# Altium PCB Rail_Gun.PcbDoc
Units mm, origin at the board's own origin, x right, y up, seen from the top; angles counter-clockwise.
Board outline 255.02 x 63.37 mm, 2 copper layers (Top Layer, Bottom Layer); 88 components, 48 nets, 175 pads, 0 vias.
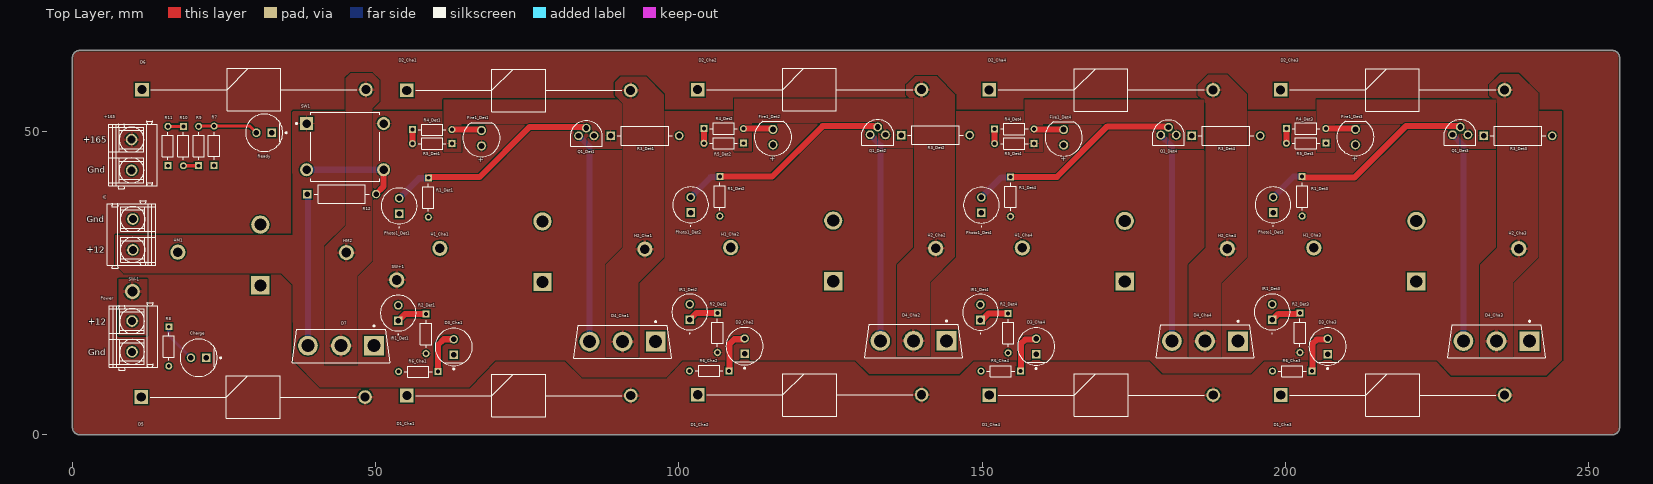
[diagram p0: Top Layer view]
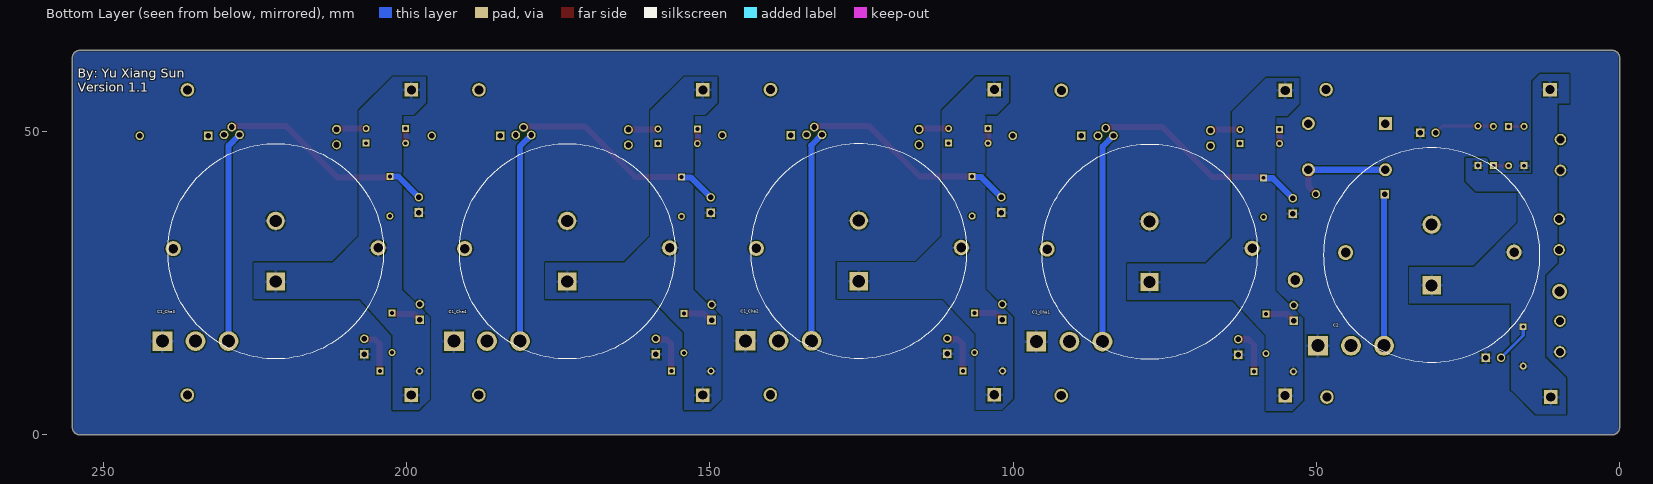
[diagram p1: Bottom Layer view, seen from below]
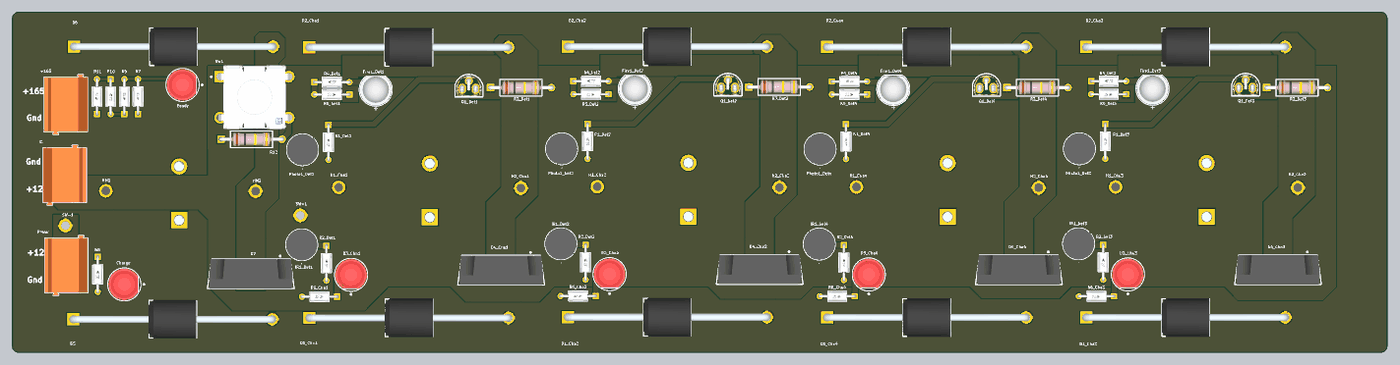
[diagram p2: 3D render of the assembled board from above, using the file's embedded part models]
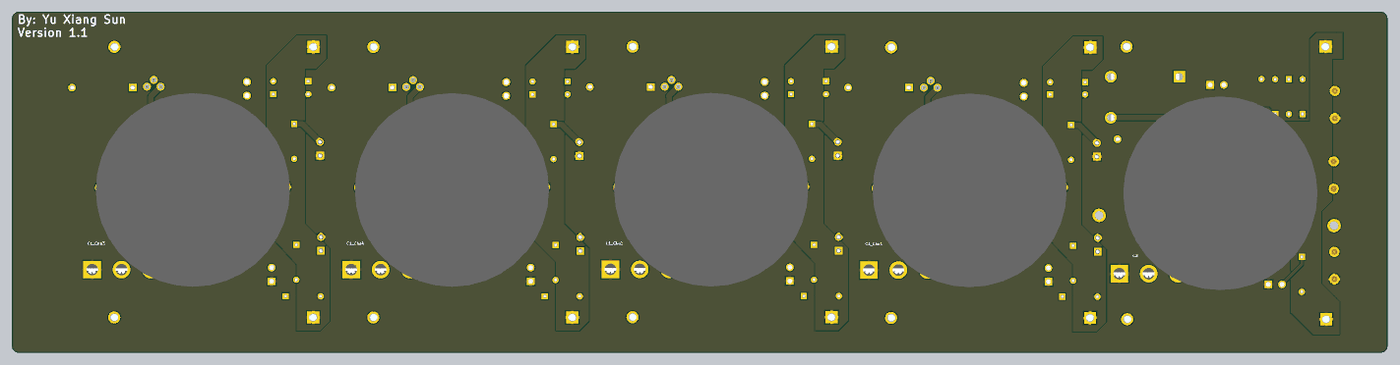
[diagram p3: 3D render of the assembled board from below, using the file's embedded part models]

## Layer stack, top to bottom
Top Solder: solder mask 0.0102, Solder Resist, Dk 3.5
Top Layer: signal copper 0.0356
Dielectric 1: dielectric 0.32, FR-4, Dk 4.8
Bottom Layer: signal copper 0.0356
Bottom Solder: solder mask 0.0102, Solder Resist, Dk 3.5

## Board outline
1.315,-0.061 cw(c1.315,1.209) 0.045,1.209 0.045,62.042 cw(c1.315,62.042) 1.315,63.312 253.791,63.312 cw(c253.791,62.042) 255.061,62.042 255.061,1.209 cw(c253.791,1.209) 253.791,-0.061

## Design rules (kind name [scope] priority, off if disabled: settings)
BoardOutlineClearance [All] p1: gap=0.2 ignorepadtopadclearanceinfootprint=FALSE
Clearance [All] p1: gap=0.203 ignorepadtopadclearanceinfootprint=FALSE except(0.25: Arc-Hole Track-Hole SMDPad-Hole THPad-Hole Via-Hole Fill-Hole Poly-Hole Region-Hole Text-Hole)
ComponentClearance [All] p1: gap=0.127 collisioncheckmode=3 verticalgap=0.127 showdistances=TRUE
DiffPairsRouting [All] p1: maxlimit=0.381 minlimit=0.203 mostfreqgap=0.203 toplayer_minwidth=0.203 toplayer_maxwidth=25.4 toplayer_prefwidth=0.203 bottomlayer_minwidth=0.203 bottomlayer_maxwidth=25.4 bottomlayer_prefwidth=0.203 maxuncoupledlength=12.7
Height [All] p1: minheight=0 maxheight=1816.048 prefheight=12.7
HoleSize [All] p1: absolutevalues=TRUE maxlimit=6.3 minlimit=0.3 maxpercent=80.000 minpercent=20.000
HoleToHoleClearance [All] p1: gap=0.25 allowstackedmicrovias=FALSE
MinimumAnnularRing [All] p1: minimumring=0.076
MinimumSolderMaskSliver [All] p1: minsoldermaskwidth=0
PlaneClearance [All] p1: clearance=0.203
PlaneConnect [All] p1: pad.planeconnectstyle=Relief pad.reliefexpansion=0.3 pad.reliefentries=4 pad.reliefconductorwidth=0.203 pad.reliefairgap=0.203 via.planeconnectstyle=Direct via.reliefexpansion=0.3 via.reliefentries=4 via.reliefconductorwidth=0.127 via.reliefairgap=0.127
PlaneConnect PlaneConnectPowerPads [InPadClass('PowerPads')] p2: planeconnectstyle=Direct reliefexpansion=0.508 reliefentries=4 reliefconductorwidth=0.254 reliefairgap=0.254
PolygonConnect Discharge [InNetClass('Discharge')] p1: thpad.connectstyle=Relief thpad.reliefconductorwidth=0.5 thpad.reliefentries=4 thpad.polygonreliefangle="90 Angle" thpad.airgapwidth=0.254 smdpad.connectstyle=Relief smdpad.reliefconductorwidth=0.5 smdpad.reliefentries=4 smdpad.polygonreliefangle="90 Angle" smdpad.airgapwidth=0.254 via.connectstyle=Relief via.reliefconductorwidth=0.254 via.reliefentries=4 via.polygonreliefangle="90 Angle" via.airgapwidth=0.254
PolygonConnect 2mmHole [HasFootprint('2mmHole')] p2: thpad.connectstyle=Relief thpad.reliefconductorwidth=0.5 thpad.reliefentries=4 thpad.polygonreliefangle="90 Angle" thpad.airgapwidth=0.254 smdpad.connectstyle=Relief smdpad.reliefconductorwidth=0.254 smdpad.reliefentries=4 smdpad.polygonreliefangle="90 Angle" smdpad.airgapwidth=0.254 via.connectstyle=Relief via.reliefconductorwidth=0.254 via.reliefentries=4 via.polygonreliefangle="90 Angle" via.airgapwidth=0.254
PolygonConnect PolygonConnectPowerPads [All vs (InPadClass('PowerPads'))] p3: connectstyle=Direct reliefconductorwidth=0.254 reliefentries=4 polygonreliefangle="90 Angle" airgapwidth=0.254
PolygonConnect [All] p4: thpad.connectstyle=Relief thpad.reliefconductorwidth=0.203 thpad.reliefentries=4 thpad.polygonreliefangle="90 Angle" thpad.airgapwidth=0.203 smdpad.connectstyle=Relief smdpad.reliefconductorwidth=0.203 smdpad.reliefentries=4 smdpad.polygonreliefangle="90 Angle" smdpad.airgapwidth=0.203 via.connectstyle=Direct via.reliefconductorwidth=0.127 via.reliefentries=4 via.polygonreliefangle="90 Angle" via.airgapwidth=0.127
RoomDefinition Cha1 [InComponentClass('Cha1')] p1: confinementstyle=ConfineIn formatcopy=TRUE lockcomponents=FALSE outline 94.615,54.229 94.742,54.356 94.742,60.96 53.721,60.96 52.832,60.071 52.832,44.45 53.594,43.688 62.992,43.688 62.992,37.973 56.134,31.115 56.134,24.13 56.642,24.13 60.452,20.32 59.563,19.431 59.563,12.7 54.229,12.7 52.705,11.176 53.467,10.414 53.467,1.524 98.298,1.524 100.711,3.937 100.711,16.891 96.139,21.463 96.139,40.894 69.342,40.894 63.373,46.863 55.753,46.863 55.753,47.27 55.118,47.905 55.118,52.451 55.753,53.086
RoomDefinition Det2 [InComponentClass('Det2')] p2: confinementstyle=ConfineIn formatcopy=TRUE lockcomponents=FALSE outline 102.436,52.569 102.182,52.315 102.182,42.155 101.42,42.155 98.118,38.853 98.118,19.041 98.372,19.041 104.849,12.564 107.643,12.564 107.643,18.279 108.278,18.914 109.167,18.025 152.474,18.025 152.474,22.724 145.235,29.963 145.235,43.679 148.537,43.679 150.061,45.203 149.299,45.965 149.299,52.823
RoomDefinition Coil_Gun_Master [InComponentClass('Coil_Gun_Master')] p3: confinementstyle=ConfineIn formatcopy=TRUE lockcomponents=FALSE outline 0.045,63.312 0.172,63.439 53.512,63.439 53.512,0.193 53.131,-0.188 0.172,-0.188 0.172,0.193 -2.622,2.987
RoomDefinition Det3 [InComponentClass('Det3')] p4: confinementstyle=ConfineIn formatcopy=TRUE lockcomponents=FALSE outline 198.419,52.569 198.165,52.315 198.165,42.155 197.403,42.155 194.101,38.853 194.101,19.041 194.355,19.041 200.832,12.564 203.626,12.564 203.626,18.279 204.261,18.914 205.15,18.025 248.457,18.025 248.457,22.724 241.218,29.963 241.218,43.679 244.52,43.679 246.044,45.203 245.282,45.965 245.282,52.823
RoomDefinition Cha3 [InComponentClass('Cha3')] p5: confinementstyle=ConfineIn formatcopy=TRUE lockcomponents=FALSE outline 197.532,61.482 245.538,61.482 246.3,60.72 246.3,53.354 200.199,53.354 198.802,51.957 198.802,43.575 211.629,43.575 216.074,48.02 230.806,48.02 241.474,37.352 241.474,27.954 238.553,27.954 236.648,26.049 236.775,25.922 236.775,19.191 241.474,19.191 245.157,15.508 245.157,0.014 198.167,0.014 197.278,0.903 197.278,12.714 202.096,12.714 204.263,14.882 204.263,27.319 197.151,34.431 197.151,41.797
RoomDefinition Cha2 [InComponentClass('Cha2')] p6: confinementstyle=ConfineIn formatcopy=FALSE lockcomponents=FALSE outline 101.443,61.534 149.449,61.534 150.211,60.772 150.211,53.406 104.11,53.406 102.713,52.009 102.713,43.627 115.54,43.627 119.985,48.072 134.717,48.072 145.385,37.404 145.385,28.006 142.464,28.006 140.559,26.101 140.686,25.974 140.686,19.243 145.385,19.243 149.068,15.56 149.068,0.066 102.078,0.066 101.189,0.955 101.189,12.766 106.006,12.766 108.174,14.933 108.174,27.371 101.062,34.483 101.062,41.849
RoomDefinition Cha4 [InComponentClass('Cha4')] p7: confinementstyle=ConfineIn formatcopy=TRUE lockcomponents=FALSE outline 149.495,61.482 197.501,61.482 198.263,60.72 198.263,53.354 152.162,53.354 150.765,51.957 150.765,43.575 163.592,43.575 168.037,48.02 182.769,48.02 193.437,37.352 193.437,27.954 190.516,27.954 188.611,26.049 188.738,25.922 188.738,19.191 193.437,19.191 197.12,15.508 197.12,0.014 150.13,0.014 149.241,0.903 149.241,12.714 154.058,12.714 156.226,14.881 156.226,27.319 149.114,34.431 149.114,41.797
RoomDefinition Det1 [InComponentClass('Det1')] p8: confinementstyle=ConfineIn formatcopy=FALSE lockcomponents=FALSE outline 54.401,52.39 54.147,52.136 54.147,41.976 53.385,41.976 50.083,38.674 50.083,18.862 50.337,18.862 56.814,12.385 59.608,12.385 59.608,18.1 60.243,18.735 61.132,17.846 104.439,17.846 104.439,22.545 97.2,29.784 97.2,43.5 100.502,43.5 102.026,45.024 101.264,45.786 101.264,52.644
RoomDefinition Det4 [InComponentClass('Det4')] p9: confinementstyle=ConfineIn formatcopy=TRUE lockcomponents=FALSE outline 150.348,52.517 150.094,52.263 150.094,42.103 149.332,42.103 146.03,38.801 146.03,18.989 146.284,18.989 152.761,12.512 155.555,12.512 155.555,18.227 156.19,18.862 157.079,17.973 200.386,17.973 200.386,22.672 193.147,29.911 193.147,43.627 196.449,43.627 197.973,45.151 197.211,45.913 197.211,52.771
RoutingVias [All] p1: holewidth=0.3 width=0.6 viastyle="Through Hole" minholewidth=0.3 minwidth=0.6 maxholewidth=0.6 maxwidth=6.6
SilkToSilkClearance [All] p1: silktosilkclearance=0
SilkToSolderMaskClearance [IsPad] p1: minsilkscreentomaskgap=0.127 clearancetoexposedcopper=TRUE
SolderMaskExpansion [All] p1: expansion=0.075 istentingtop=FALSE
SupplyNets "Schematic Supply Nets_1" [InNet('+165')] p1: voltage=0.000
SupplyNets "Schematic Supply Nets_3" [InNet('Power')] p2: voltage=0.000
SupplyNets "Schematic Supply Nets_2" [InNet('+12')] p3: voltage=0.000
SupplyNets "Schematic Supply Nets" [InNet('GND')] p4: voltage=0.000
UnpouredPolygon [InNet('GND')] p1:
Width [All] p1: maxlimit=25.4 minlimit=0.203 preferedwidth=0.203 minimp=50.000000 maximp=50.000000 favimp=50.000000
19 further rules are at their usual default settings.

## Classes and differential pairs
net class Discharge: +165 GND NetC1_Cha1_1 NetC1_Cha2_1 NetC1_Cha3_1 NetC1_Cha4_1 NetC2_1 NetD2_Cha1_2 NetD2_Cha2_2 NetD2_Cha3_2 NetD2_Cha4_2 NetD6_2
component class Det4: Fire1_Det4 IR1_Det4 Photo1_Det4 Q1_Det4 R1_Det4 R2_Det4 R3_Det4 R4_Det4 R5_Det4
component class Det3: Fire1_Det3 IR1_Det3 Photo1_Det3 Q1_Det3 R1_Det3 R2_Det3 R3_Det3 R4_Det3 R5_Det3
component class Cha4: C1_Cha4 D1_Cha4 D2_Cha4 D3_Cha4 D4_Cha4 H1_Cha4 H2_Cha4 R6_Cha4
component class Cha3: C1_Cha3 D1_Cha3 D2_Cha3 D3_Cha3 D4_Cha3 H1_Cha3 H2_Cha3 R6_Cha3
component class Det2: Fire1_Det2 IR1_Det2 Photo1_Det2 Q1_Det2 R1_Det2 R2_Det2 R3_Det2 R4_Det2 R5_Det2
component class Cha2: C1_Cha2 D1_Cha2 D2_Cha2 D3_Cha2 D4_Cha2 H1_Cha2 H2_Cha2 R6_Cha2
channel class Detection_Circuit: Det1 Det2 Det3 Det4
channel class Charge_Discharge: Cha1 Cha2 Cha3 Cha4
component class Det1: Fire1_Det1 IR1_Det1 Photo1_Det1 Q1_Det1 R1_Det1 R2_Det1 R3_Det1 R4_Det1 R5_Det1
component class Cha1: C1_Cha1 D1_Cha1 D2_Cha1 D3_Cha1 D4_Cha1 H1_Cha1 H2_Cha1 L1 R6_Cha1
component class Coil_Gun_Master: +165 C2 Charge D5 D6 D7 HM1 HM2 IC Power R7 R8 R9 R10 R11 R12 Ready SW1 SW+1 SW-1

## Components (designator, comment, footprint, x,y, rotation, side; value= is the part's Value field where it differs from the comment)
+165 "Power" PM_5_08_90_02 10.016,46.066 r270 top
C1_Cha1 "1000uF 450V" CAPPRD1000W180D3550H6250 77.515,25.118 r90 bottom (schematic designator C1)
C1_Cha2 "1000uF 450V" CAPPRD1000W180D3550H6250 125.446,25.245 r90 bottom (schematic designator C1)
C1_Cha3 "1000uF 450V" CAPPRD1000W180D3550H6250 221.535,25.193 r90 bottom (schematic designator C1)
C1_Cha4 "1000uF 450V" CAPPRD1000W180D3550H6250 173.498,25.193 r90 bottom (schematic designator C1)
C2 "1000uF 450V" CAPPRD1000W180D3550H6250 31.033,24.577 r90 bottom
Charge "Blue LED" FP-XLUR12D-MFG 20.873,12.639 r180 top (schematic designator Charge1)
D1_Cha1 "6A10GHR0" DIOAD3685W130L885D700 55.186,6.416 r0 top (schematic designator D1)
D1_Cha2 "6A10GHR0" DIOAD3685W130L885D700 103.117,6.543 r0 top (schematic designator D1)
D1_Cha3 "6A10GHR0" DIOAD3685W130L885D700 199.206,6.491 r0 top (schematic designator D1)
D1_Cha4 "6A10GHR0" DIOAD3685W130L885D700 151.169,6.491 r0 top (schematic designator D1)
D2_Cha1 "FR-605" DIOAD3685W130L885D700 55.163,56.708 r0 top (schematic designator D2)
D2_Cha2 "FR-605" DIOAD3685W130L885D700 103.094,56.835 r0 top (schematic designator D2)
D2_Cha3 "FR-605" DIOAD3685W130L885D700 199.183,56.783 r0 top (schematic designator D2)
D2_Cha4 "FR-605" DIOAD3685W130L885D700 151.146,56.783 r0 top (schematic designator D2)
D3_Cha1 "Blue LED" FP-XLUR12D-MFG 62.91,14.417 r90 top (schematic designator D3)
D3_Cha2 "Blue LED" FP-XLUR12D-MFG 110.841,14.544 r90 top (schematic designator D3)
D3_Cha3 "Blue LED" FP-XLUR12D-MFG 206.93,14.492 r90 top (schematic designator D3)
D3_Cha4 "Blue LED" FP-XLUR12D-MFG 158.893,14.492 r90 top (schematic designator D3)
D4_Cha1 "Thrysistor" FP-VS-70TPS12PBF-0 90.734,15.281 r270 top (schematic designator D4)
D4_Cha2 "Thrysistor" FP-VS-70TPS12PBF-0 138.665,15.408 r270 top (schematic designator D4)
D4_Cha3 "Thrysistor" FP-VS-70TPS12PBF-0 234.754,15.356 r270 top (schematic designator D4)
D4_Cha4 "Thrysistor" FP-VS-70TPS12PBF-0 186.717,15.356 r270 top (schematic designator D4)
D5 "6A10GHR0" DIOAD3685W130L885D700 11.405,6.162 r0 top
D6 "FR605G" DIOAD3685W130L885D700 11.532,56.835 r0 top
D7 "Thrysistor" FP-VS-70TPS12PBF-0 44.326,14.603 r270 top
Fire1_Det1 "Red LED" WL-TMRC_D5.9H8.7 67.482,48.834 r90 top (schematic designator Fire1)
Fire1_Det2 "Red LED" WL-TMRC_D5.9H8.7 115.517,49.013 r90 top (schematic designator Fire1)
Fire1_Det3 "Red LED" WL-TMRC_D5.9H8.7 211.5,49.013 r90 top (schematic designator Fire1)
Fire1_Det4 "Red LED" WL-TMRC_D5.9H8.7 163.429,48.961 r90 top (schematic designator Fire1)
H1_Cha1 "2mm Hole" 2mmHole 60.624,30.8 r90 top (schematic designator H1)
H1_Cha2 "2mm Hole" 2mmHole 108.555,30.927 r90 top (schematic designator H1)
H1_Cha3 "2mm Hole" 2mmHole 204.644,30.875 r90 top (schematic designator H1)
H1_Cha4 "2mm Hole" 2mmHole 156.607,30.875 r90 top (schematic designator H1)
H2_Cha1 "2mm Hole" 2mmHole 94.406,30.673 r90 top (schematic designator H2)
H2_Cha2 "2mm Hole" 2mmHole 142.337,30.8 r90 top (schematic designator H2)
H2_Cha3 "2mm Hole" 2mmHole 238.426,30.748 r90 top (schematic designator H2)
H2_Cha4 "2mm Hole" 2mmHole 190.389,30.748 r90 top (schematic designator H2)
HM1 "2mm Hole" 2mmHole 17.571,30.038 r0 top
HM2 "2mm Hole" 2mmHole 45.339,29.972 r0 top
IC "IC Power" PM_5_08_90_02 9.824,32.959 r90 top
IR1_Det1 "IR333_H0-A" IR333H0A 53.766,18.735 r90 top (schematic designator IR1)
IR1_Det2 "IR333_H0-A" IR333H0A 101.801,18.914 r90 top (schematic designator IR1)
IR1_Det3 "IR333_H0-A" IR333H0A 197.784,18.914 r90 top (schematic designator IR1)
IR1_Det4 "IR333_H0-A" IR333H0A 149.713,18.862 r90 top (schematic designator IR1)
Photo1_Det1 "PT334-6C" PT3346C 53.915,36.395 r90 top (schematic designator Photo1)
Photo1_Det2 "PT334-6C" PT3346C 101.95,36.574 r90 top (schematic designator Photo1)
Photo1_Det3 "PT334-6C" PT3346C 197.933,36.574 r90 top (schematic designator Photo1)
Photo1_Det4 "PT334-6C" PT3346C 149.862,36.522 r90 top (schematic designator Photo1)
Power "IC Power" PM_5_08_90_02 10.098,16.152 r270 top
Q1_Det1 "SS8050DBU" FP-135AN-MFG 84.754,49.595 r270 top (schematic designator Q1)
Q1_Det2 "SS8050DBU" FP-135AN-MFG 132.789,49.774 r270 top (schematic designator Q1)
Q1_Det3 "SS8050DBU" FP-135AN-MFG 228.772,49.774 r270 top (schematic designator Q1)
Q1_Det4 "SS8050DBU" FP-135AN-MFG 180.701,49.722 r270 top (schematic designator Q1)
R1_Det1 "10k" FP-CFR16-MFG 58.719,39.055 r270 top (schematic designator R1)
R1_Det2 "10k" FP-CFR16-MFG 106.754,39.234 r270 top (schematic designator R1)
R1_Det3 "10k" FP-CFR16-MFG 202.737,39.234 r270 top (schematic designator R1)
R1_Det4 "10k" FP-CFR16-MFG 154.666,39.182 r270 top (schematic designator R1)
R2_Det1 "2.2k" FP-CFR16-MFG 58.338,16.576 r270 top (schematic designator R2)
R2_Det2 "2.2k" FP-CFR16-MFG 106.373,16.755 r270 top (schematic designator R2)
R2_Det3 "2.2k" FP-CFR16-MFG 202.356,16.755 r270 top (schematic designator R2)
R2_Det4 "2.2k" FP-CFR16-MFG 154.285,16.703 r270 top (schematic designator R2)
R3_Det1 "47 1W" FP-RR01-MFG 94.406,49.215 r0 top (schematic designator R3)
R3_Det2 "47 1W" FP-RR01-MFG 142.285,49.342 r0 top (schematic designator R3)
R3_Det3 "47 1W" FP-RR01-MFG 238.297,49.215 r0 top (schematic designator R3)
R3_Det4 "47 1W" FP-RR01-MFG 190.164,49.215 r0 top (schematic designator R3)
R4_Det1 "68" FP-CFR16-MFG 59.354,50.231 r0 top (schematic designator R4)
R4_Det2 "68" FP-CFR16-MFG 107.389,50.41 r0 top (schematic designator R4)
R4_Det3 "68" FP-CFR16-MFG 203.372,50.41 r0 top (schematic designator R4)
R4_Det4 "68" FP-CFR16-MFG 155.301,50.358 r0 top (schematic designator R4)
R5_Det1 "20" FP-CFR16-MFG 59.354,47.945 r180 top (schematic designator R5)
R5_Det2 "20" FP-CFR16-MFG 107.389,47.997 r180 top (schematic designator R5)
R5_Det3 "20" FP-CFR16-MFG 203.372,47.997 r180 top (schematic designator R5)
R5_Det4 "20" FP-CFR16-MFG 155.301,47.945 r180 top (schematic designator R5)
R6_Cha1 "1M" FP-CFR16-MFG 57.068,10.353 r180 top (schematic designator R6)
R6_Cha2 "1M" FP-CFR16-MFG 104.999,10.48 r180 top (schematic designator R6)
R6_Cha3 "1M" FP-CFR16-MFG 201.088,10.428 r180 top (schematic designator R6)
R6_Cha4 "1M" FP-CFR16-MFG 153.051,10.428 r180 top (schematic designator R6)
R7 "1M" FP-CFR16-MFG 23.413,47.564 r90 top
R8 "1M" FP-CFR16-MFG 15.943,14.502 r270 top
R9 "10k" FP-CFR16-MFG 20.878,47.537 r90 top
R10 "10k" FP-CFR16-MFG 18.338,47.537 r270 top
R11 "2.2k" FP-CFR16-MFG 15.798,47.537 r90 top
R12 "400 1W" FP-RR01-MFG 44.45,39.624 r0 top
Ready "White" FP-XLUR12D-MFG 31.668,49.723 r180 top (schematic designator Ready1)
SW1 "Initial Switch" FP-1241_1625_8-MFG 45.003,47.437 r0 top
SW+1 "2mm Hole" 2mmHole 53.639,25.466 r0 top
SW-1 "2mm Hole" 2mmHole 10.078,23.561 r0 top

## Footprints (in the part's own frame and the unit in brackets; to place one, negate y for a bottom-side part, rotate by r counter-clockwise, add the part's x,y. Pads: shape width x height; smd on the part's side, far side on the other; paste and mask are expansions set on the pad)
2mmHole [mm]
  round 2.5 / inner round 1.524 / far side round 2.5 hole 1.6 paste-2539.97: 1(-0.127,0)
CAPPRD1000W180D3550H6250 [mm]
  rect 3x3 hole 2: 1(0,0)
  round 3 hole 2: 2(10,0)
  silkscreen extent -12.75,-17.75 22.75,17.75, body extent -13,-17.97 23,17.97, height 62.5
DIOAD3685W130L885D700 [mm]
  rect 2.25x2.25 hole 1.5: 1(0,0)
  round 2.25 hole 1.5: 2(36.9,0)
  silkscreen extent 1.48,-3.5 35.42,3.5, body extent -0.65,-3.59 37.5,3.59, height 7.2
FP-135AN-MFG [mm]
  round 1.45 hole 0.95 paste-2539.97 mask+0: 1(0.38,-1.27) 2(-0.89,0) 3(0.38,1.27)
  silkscreen extent -2.1,-2.6 2.09,2.6, body extent -2.19,-2.7 2.19,2.7, height 0.25
FP-1241_1625_8-MFG [mm]
  rect 2.15x2.15 hole 1.4 paste-2539.97 mask+0: 1(-6.35,3.81)
  round 2.15 hole 1.4 paste-2539.97 mask+0: 2(6.35,3.81) 3(-6.35,-3.81) 4(6.35,-3.81)
  silkscreen extent -8.12,-5.7 5.7,5.7, body extent -7.52,-5.8 7.52,5.8, height 0.25
FP-CFR16-MFG [mm]
  rect 1.15x1.15 hole 0.65 paste-2539.97 mask+0: 1(-3.25,0)
  round 1.15 hole 0.65 paste-2539.97 mask+0: 2(3.25,0)
  silkscreen extent -2.27,-0.92 2.27,0.92, body extent -3.93,-1.02 3.93,1.02, height 0.25
FP-RR01-MFG [mm]
  rect 1.4x1.4 hole 0.9 paste-2539.97 mask+0: 1(-5.65,0)
  round 1.4 hole 0.9 paste-2539.97 mask+0: 2(5.65,0)
  silkscreen extent -4.55,-1.55 4.55,1.55, body extent -6.45,-1.65 6.45,1.65, height 0.25
FP-VS-70TPS12PBF-0 [mm]
  rect 3.25x3.25 hole 2.15 paste-2539.97 mask+0: 1(-0.025,5.45)
  round 3.25 hole 2.15 paste-2539.97 mask+0: 2(-0.025,0) 3(-0.025,-5.45)
  silkscreen extent -3.42,-8.05 2.75,8.05, body extent -2.85,-8.15 2.85,8.15, height 0.25
FP-XLUR12D-MFG [mm]
  rect 1.4x1.4 hole 0.9 paste-2539.97 mask+0: 1(-1.27,0)
  round 1.4 hole 0.9 paste-2539.97 mask+0: 2(1.27,0)
  silkscreen extent -3.75,-3.08 3.08,3.08, body extent -3.17,-3.17 3.17,3.17, height 0.25
IR333H0A [mm]
  rect 1.416x1.416 hole 0.91: 1(0,0)
  round 1.416 hole 0.91: 2(2.54,0)
  silkscreen extent -2.3,-2.95 4.22,2.95, body extent -1.68,-2.95 4.22,2.95, height 10.5
PM_5_08_90_02 [mm] "PM 5.08/02/90 3.5"
  round 1.9 hole 1.3: A1(-2.54,-0.2) A2(2.54,-0.2)
  silkscreen extent -5.58,-4 5.58,4, body extent -5.58,-4 5.58,4, height 10.01
PT3346C [mm]
  rect 1.416x1.416 hole 0.91: 1(0,0)
  round 1.416 hole 0.91: 2(2.54,0)
  silkscreen extent -2.3,-2.95 4.22,2.95, body extent -1.68,-2.95 4.22,2.95, height 10.5
WL-TMRC_D5.9H8.7 [mm] "THT Mono-color Round Color LED, 2-leads"
  round 1.5 hole 1: 1(-1.27,0) 2(1.27,0)
  silkscreen extent -3.07,-3.07 2.58,3.08, body extent -2.95,-2.95 2.45,2.95, height 9.2

## Part data
+165 IC Power: library part CMP-1559-01627-1, "OMNIMATE Signal - series PM", Colour=Orange, Manufacturer=Weidmueller, PartNumber=1760490000, Rated_current_use_group_B_UL_1059="15 A", Rated_voltage_for_surge_voltage_class_pollution_degree_II_2="600 V", Rated_voltage_use_group_B_UL_1059="300 V", UL_94_flammability_rating=V-0, ComponentLink1Description="Manufacturer URL", ComponentLink1URL=http://www.weidmueller.com/, ComponentLink2Description="URL Link1", ComponentLink2URL=http://catalog.weidmueller.com/catalog/Start.do?localeId=en&ObjectID=1760490000, Contact_material=Cu-Leg, Contact_surface=tinned, Insulating_material="Wemid (PA)", Mounting_onto_the_PCB="Solder connection", No_of_poles=2, PackageReference=PM_5_08_90_02, Packaging=Box, Pitch_inch="0,2 inch", Pitch_mm="5,08 mm", Qty="500 PCS", Revision=V1, Short_text_for_material="PM 5.08/02/90 3.5SN OR BX", Side_termination_characteristic="closed side", Solder_pin_length_mm="3,5 mm", Solid_max_H05_07_V_U="2,5 mm²", Solid_min_H05_07_V_U="0,13 mm²", Wire_cross_section_AWG_max_UL_1059="AWG 14", Wire_cross_section_AWG_min_UL_1059="AWG 26"
C1_Cha1 C1_Cha2 C1_Cha3 C1_Cha4 C2: library part EKHS451VSN102MA60S, "Capacitor Polarised", Manufacturer_Name=Chemi-Con, Datasheet Link=https://www.mouser.cn/datasheet/2/420/United-Chemi-Con-1708643.pdf, Height=62.5mm, Manufacturer_Part_Number=EKHS451VSN102MA60S
Charge D3_Cha1 D3_Cha2 D3_Cha3 D3_Cha4 Ready: library part CMP-02085-08376351-1, "627nm Red LED; 5x8.6mm, Through-Hole Mount with Red Diffused Round Lamp", Case/Package=Radial, Color=Red, Forward Voltage=1.9V, Test Current=10mA, Dominant Wavelength=617nm, Height=8.6mm, Lens Color=Red, Lens Transparency=Diffused, Lifecycle Status=Production, Luminous Intensity=39mcd, Mount="Through Hole", RoHS=Compliant, Viewing Angle=30°, Wavelength=627nm
D1_Cha1 D1_Cha2 D1_Cha3 D1_Cha4 D5: "Diode", Manufacturer_Name="Taiwan Semiconductor", Mouser Part Number=821-6A10GHR0, Datasheet Link=https://www.mouser.ca/ProductDetail/Taiwan-Semiconductor/6A10GHR0/?qs=iDAqbRYIEyDCJDGbzj9j3Q%3D%3D, Manufacturer_Part_Number=6A10GHR0, Mouser Price/Stock=https://www.mouser.co.uk/ProductDetail/Taiwan-Semiconductor/6A10GHR0/?qs=iDAqbRYIEyDCJDGbzj9j3Q%3D%3D
D2_Cha1 D2_Cha2 D2_Cha3 D2_Cha4 D6: library part 6A10GHR0, "Diode", Manufacturer_Name="Taiwan Semiconductor", Mouser Part Number=821-6A10GHR0, Datasheet Link=https://www.mouser.ca/ProductDetail/Taiwan-Semiconductor/6A10GHR0/?qs=iDAqbRYIEyDCJDGbzj9j3Q%3D%3D, Manufacturer_Part_Number=6A10GHR0, Mouser Price/Stock=https://www.mouser.co.uk/ProductDetail/Taiwan-Semiconductor/6A10GHR0/?qs=iDAqbRYIEyDCJDGbzj9j3Q%3D%3D
D4_Cha1 D4_Cha2 D4_Cha3 D4_Cha4 D7: library part CMP-02544-000003-1, "SCR 1.2KV 75A SUPER-247", Case/Package=TO-247, Current Rating=70A, Forward Voltage=1.4V, Hold Current=200mA, Max Operating Temperature=125°C, Max Repetitive Reverse Voltage (Vrrm)=1.2kV, Min Operating Temperature=-40°C, Package Quantity=500, RMS Current (Irms)=75A, Contact Plating=Tin, Height=20.8mm, Length=16.1mm, Mount="Through Hole", Number of Pins=247, Packaging=Bulk, Radiation Hardening=No, RoHS Compliant=Yes, Series=-, Weight=0.211644oz, Width=5.5mm
Fire1_Det1 Fire1_Det2 Fire1_Det3 Fire1_Det4: library part CMP-1488-00008-3, "WL-TMRC Red Color Diffused 5 mm Round Through Hole LED", Case/Package=Radial, Color=Red, Forward Current=100mA, Forward Voltage=2.1V, Manufacturer Lifecycle Status=ACTIVE, Max Operating Temperature=85°C, Max Reverse Voltage (DC)=5V, Min Operating Temperature=-40°C, Test Current=20mA, Dominant Wavelength=645nm, Height=8.6mm, Length=5mm, Lens Size=5mm, Lens Style="Circular, Diffused, Round", Lifecycle Status=Production, Luminous Intensity=30mcd, Mount="Through Hole", Packaging=Bulk, Peak Wavelength=650nm, REACH SVHC=Unknown, RoHS=Compliant, Viewing Angle=60°, Wavelength=630nm, Width=5mm, YEOL="1 = Estimated lifetime > 10 years"
H1_Cha1 H1_Cha2 H1_Cha3 H1_Cha4 H2_Cha1 H2_Cha2 H2_Cha3 H2_Cha4 HM1 HM2 SW+1 SW-1: library part Hole2
IR1_Det1 IR1_Det2 IR1_Det3 IR1_Det4: "LED", Manufacturer_Name=Everlight, Manufacturer_Part_Number=IR333/H0-A, Mouser Part Number=638-IR333/H0-A, Datasheet Link=https://datasheet.lcsc.com/lcsc/1808280419_Everlight-Elec-IR333-H0-A_C264292.pdf, Height=10.4mm, Mouser Price/Stock=https://www.mouser.co.uk/ProductDetail/Everlight/IR333-H0-A?qs=By6Nw2ByBD39%252BlkBkN%2FobQ%3D%3D
Photo1_Det1 Photo1_Det2 Photo1_Det3 Photo1_Det4: "Phototransistor", Manufacturer_Name=Everlight, Mouser Part Number=638-PT334-6C, Arrow Part Number=PT334-6C, Arrow Price/Stock=https://www.arrow.com/en/products/pt334-6c/everlight-electronics?utm_currency=USD&region=nac, Datasheet Link=https://ar.mouser.com/datasheet/2/143/EVER_S_A0003541250_1-2548712.pdf, Height=10.4mm, Manufacturer_Part_Number=PT334-6C, Mouser Price/Stock=https://www.mouser.co.uk/ProductDetail/Everlight/PT334-6C?qs=1zthkiRbLn0w%252B4NEo66uDw%3D%3D
Q1_Det1 Q1_Det2 Q1_Det3 Q1_Det4: library part CMP-00278-84331634-1, "SS8050DBU Bipolar (BJT) Single Transistor, NPN, 25 V, 100 MHz, 1 W, 1.5 A, 160", Case/Package=TO-92, Collector Base Voltage (VCBO)=40V, Collector Emitter Breakdown Voltage=25V, Collector Emitter Saturation Voltage=500mV, Current Rating=1.5A, Emitter Base Voltage (VEBO)=6V, Frequency=100MHz, Manufacturer Lifecycle Status=ACTIVE, Max Junction Temperature (Tj)=150°C, Max Power Dissipation=1W, Min Operating Temperature=-65°C, Output Power=2W, Collector Emitter Voltage (VCEO)=25V, Element Configuration=Single, Gain Bandwidth Product=100MHz, Height=4.58mm, hFE Min=85, Lead Free="Lead Free", Length=4.58mm, Lifecycle Status=Production, Max Collector Current=1.5A, Max Frequency=100MHz, Max Operating Temperature=150°C, Mount="Through Hole", NexarPartId=84331634, Number of Elements=1, Number of Pins=3, Packaging=Bulk, Polarity=NPN, Power Dissipation=1W, Radiation Hardening=No, REACH SVHC="No SVHC", RoHS=Compliant, Schedule B="8541290080, 8541290080", Transition Frequency=100MHz, Voltage Rating (DC)=25V, Weight=179mg, Width=3.86mm
R1_Det1 R1_Det2 R1_Det3 R1_Det4 R2_Det1 R2_Det2 R2_Det3 R2_Det4 R4_Det1 R4_Det2 R4_Det3 R4_Det4 R5_Det1 R5_Det2 R5_Det3 R5_Det4 R6_Cha1 R6_Cha2 R6_Cha3 R6_Cha4 R7 R8 R9 R10 R11: library part CMP-03212-000007-1, "RES 120 OHM 1/4W 5% AXIAL", Case/Package=Axial, Max Operating Temperature=155°C, Max Power Dissipation=250mW, Min Operating Temperature=-55°C, Number of Resistors=1, Package Quantity=5000, Resistance=120R, Resistance Tolerance=5%, Resistor Type="Thin Film", Temperature Coefficient=0ppm/°C, Voltage Rating=200V, Diameter=1.85mm, ELV=Compliant, Length=3.5mm, Mount=Axial, Number of Terminations=2, Packaging="Cut Tape", Power Rating=250mW, REACH SVHC="No SVHC", RoHS Compliant=Yes, Series="CFR16, Neohm", Technology="CARBON FILM", Termination=Axial, Tolerance=5%, Voltage Rating (DC)=200V
R3_Det1 R3_Det2 R3_Det3 R3_Det4 R12: library part CMP-03212-000006-1, "RES 100 OHM 5% 1W AXIAL", Case/Package=Axial, Number of Resistors=1, Power Rating=1W, Resistance=100R, Resistor Type="Power resistor", Temperature Coefficient=300ppm/°C, Tolerance=5%, Voltage Rating=350V, ELV=Compliant, Mount=Axial, Number of Terminations=2, Packaging="Ammo Pack", RoHS Compliant=Yes
SW1: library part CMP-26316-000004-1, "SWITCH TACTILE SPST-NO 0.05A 42V", Current Rating=50mA, Max Operating Temperature=85°C, Max Voltage Rating (AC)=30V, Max Voltage Rating (DC)=42V, Min Operating Temperature=-40°C, Operating Force=220gf, Package Quantity=100, Ratings=IP67, Actuator Material=Polyphenylene, Actuator Type=Standard, Illumination Type=Non-Illuminated, Max Current Rating=50mA, Mechanical Life=1000000Cycles, Mount="Through Hole", Packaging=Bulk, Radiation Hardening=No, RoHS Compliant=Yes, Series=PMS, Switch Function=Off-Mom, Switch Travel=0.35mm, Termination="PC Pin", Throw Configuration=SPST, Voltage Rating (AC)=30V, Voltage Rating (DC)=42V, Weight=0.003527oz

## Nets (pads, with @x,y where several pads share a name; then routed paths per layer and width w, separated by ;. In a path a pad name is that pad's centre, name@x,y a point inside that pad or via, vN(x,y) a via of type N, cw(c..) or ccw(c..) an arc to the next point about the centre after c; other vN are vias at no path point)
+12: Fire1_Det1.1 Fire1_Det2.1 Fire1_Det3.1 Fire1_Det4.1 IC.A1 R1_Det1.2 R1_Det2.2 R1_Det3.2 R1_Det4.2 R2_Det1.2 R2_Det2.2 R2_Det3.2 R2_Det4.2 R3_Det1.2 R3_Det2.2 R3_Det3.2 R3_Det4.2 SW1.1 SW1.2 SW+1.1
+165: +165.A1 D1_Cha1.2 D1_Cha2.2 D1_Cha3.2 D1_Cha4.2 D5.2
GND: +165.A2 C1_Cha1.2 C1_Cha2.2 C1_Cha3.2 C1_Cha4.2 C2.2 Charge.1 D3_Cha1.1 D3_Cha2.1 D3_Cha3.1 D3_Cha4.1 D4_Cha1.1 D4_Cha2.1 D4_Cha3.1 D4_Cha4.1 D7.1 IC.A2 IR1_Det1.2 IR1_Det2.2 IR1_Det3.2 IR1_Det4.2 Photo1_Det1.1 Photo1_Det2.1 Photo1_Det3.1 Photo1_Det4.1 Power.A2 R11.1 Ready.1
NetC1_Cha1_1: C1_Cha1.1 D1_Cha1.1 D2_Cha1.1 H1_Cha1.1 R6_Cha1.2
NetC1_Cha2_1: C1_Cha2.1 D1_Cha2.1 D2_Cha2.1 H1_Cha2.1 R6_Cha2.2
NetC1_Cha3_1: C1_Cha3.1 D1_Cha3.1 D2_Cha3.1 H1_Cha3.1 R6_Cha3.2
NetC1_Cha4_1: C1_Cha4.1 D1_Cha4.1 D2_Cha4.1 H1_Cha4.1 R6_Cha4.2
NetC2_1: C2.1 D5.1 D6.1 HM1.1 R7.1 R8.2
NetCharge_2: Charge.2 R8.1 | length 6.6
  Bottom Layer w0.5: R8.1 15.943,16.299 Charge.2
NetD2_Cha1_2: D2_Cha1.2 D4_Cha1.2 H2_Cha1.1
NetD2_Cha2_2: D2_Cha2.2 D4_Cha2.2 H2_Cha2.1
NetD2_Cha3_2: D2_Cha3.2 D4_Cha3.2 H2_Cha3.1
NetD2_Cha4_2: D2_Cha4.2 D4_Cha4.2 H2_Cha4.1
NetD3_Cha1_2: D3_Cha1.2 R6_Cha1.1 | length 7.4
  Top Layer w1: R6_Cha1.1 60.318,14.746 61.259,15.687 D3_Cha1.2
NetD3_Cha2_2: D3_Cha2.2 R6_Cha2.1 | length 7.1
  Top Layer w1: R6_Cha2.1@108.324,10.48 108.324,10.998 108.324,14.873 109.138,15.687 110.605,15.687 110.656,15.738 D3_Cha2.2@110.684,15.709
NetD3_Cha3_2: D3_Cha3.2 R6_Cha3.1 | length 7.2
  Top Layer w1: R6_Cha3.1@204.413,10.428 204.413,10.946 204.413,14.948 205.1,15.635 206.695,15.635 206.745,15.686 D3_Cha3.2@206.774,15.658
NetD3_Cha4_2: D3_Cha4.2 R6_Cha4.1 | length 7.2
  Top Layer w1: R6_Cha4.1@156.376,10.428 156.376,10.946 156.376,14.948 157.063,15.635 158.657,15.635 158.708,15.686 D3_Cha4.2@158.736,15.657
NetD4_Cha1_3: D4_Cha1.3 Q1_Det1.1 | length 34.5
  Bottom Layer w1: Q1_Det1.1 85.284,47.415 D4_Cha1.3@85.284,15.433
NetD4_Cha2_3: D4_Cha2.3 Q1_Det2.1 | length 34.5
  Bottom Layer w1: Q1_Det2.1 133.319,47.594 ; D4_Cha2.3@133.215,15.56 133.215,47.542
NetD4_Cha3_3: D4_Cha3.3 Q1_Det3.1 | length 34.5
  Bottom Layer w1: Q1_Det3.1 229.302,47.594 ; D4_Cha3.3@229.304,15.508 229.304,47.49
NetD4_Cha4_3: D4_Cha4.3 Q1_Det4.1 | length 34.5
  Bottom Layer w1: Q1_Det4.1 181.231,47.542 ; D4_Cha4.3@181.267,15.508 181.267,47.49
NetD6_2: D6.2 D7.2 HM2.1
NetD7_3: D7.3 R12.1 | length 25.2
  Top Layer w2: D7.3@38.653,14.851 D7.3
  Bottom Layer w1: D7.3 R12.1@38.876,39.548
NetFire1_Det1_2: Fire1_Det1.2 R4_Det1.2 | length 4.9
  Top Layer w1: R4_Det1.2 67.219,50.231 67.346,50.104 Fire1_Det1.2
NetFire1_Det2_2: Fire1_Det2.2 R4_Det2.2 | length 4.9
  Top Layer w1: R4_Det2.2 115.254,50.41 115.381,50.283 Fire1_Det2.2
NetFire1_Det3_2: Fire1_Det3.2 R4_Det3.2 | length 4.9
  Top Layer w1: R4_Det3.2 211.019,50.41 211.05,50.379 211.404,50.379 Fire1_Det3.2
NetFire1_Det4_2: Fire1_Det4.2 R4_Det4.2 | length 5
  Top Layer w1: R4_Det4.2@158.568,50.289 158.608,50.329 158.62,50.329 158.718,50.231 163.319,50.231 Fire1_Det4.2@163.445,50.104
NetIR1_Det1_1: IR1_Det1.1 R2_Det1.1 | length 5
  Top Layer w1: IR1_Det1.1 54.857,19.826 R2_Det1.1
NetIR1_Det2_1: IR1_Det2.1 R2_Det2.1 | length 5
  Top Layer w1: IR1_Det2.1 102.009,19.122 102.917,20.031 R2_Det2.1@106.347,20.031
NetIR1_Det3_1: IR1_Det3.1 R2_Det3.1 | length 4.8
  Top Layer w1: IR1_Det3.1@197.891,18.97 197.891,19.022 197.992,19.122 198.044,19.122 198.8,19.878 201.786,19.878 201.838,19.93 R2_Det3.1@202.281,19.93
NetIR1_Det4_1: IR1_Det4.1 R2_Det4.1 | length 5.3
  Top Layer w1: IR1_Det4.1@149.655,18.654 149.655,18.805 IR1_Det4.1 149.921,19.07 150.178,19.07 151.061,19.953 R2_Det4.1
NetPhoto1_Det1_2: Photo1_Det1.2 Q1_Det1.2 R1_Det1.1 | length 35.7
  Top Layer w1: R1_Det1.1@58.719,42.432 67.176,42.432 75.387,50.643 84.075,50.643 84.147,50.571 84.667,50.571 Q1_Det1.2
  Bottom Layer w1: Photo1_Det1.2 57.21,42.23 58.644,42.23 R1_Det1.1
NetPhoto1_Det2_2: Photo1_Det2.2 Q1_Det2.2 R1_Det2.1 | length 35.8
  Top Layer w1: R1_Det2.1 115.361,42.484 123.699,50.822 132.11,50.822 132.182,50.75 132.702,50.75 Q1_Det2.2
  Bottom Layer w1: Photo1_Det2.2 105.245,42.409 106.679,42.409 R1_Det2.1
NetPhoto1_Det3_2: Photo1_Det3.2 Q1_Det3.2 R1_Det3.1 | length 35.7
  Top Layer w1: R1_Det3.1@202.906,42.331 211.344,42.331 219.88,50.866 228.251,50.866 228.367,50.75 228.685,50.75 Q1_Det3.2
  Bottom Layer w1: Photo1_Det3.2 201.303,42.484 R1_Det3.1
NetPhoto1_Det4_2: Photo1_Det4.2 Q1_Det4.2 R1_Det4.1 | length 35.9
  Top Layer w1: R1_Det4.1 162.299,42.432 170.637,50.77 180.022,50.77 180.094,50.698 180.614,50.698 Q1_Det4.2
  Bottom Layer w1: Photo1_Det4.2 153.157,42.357 154.591,42.357 R1_Det4.1@154.737,42.504
NetQ1_Det1_3: Q1_Det1.3 R3_Det1.1 R5_Det1.1
NetQ1_Det2_3: Q1_Det2.3 R3_Det2.1 R5_Det2.1
NetQ1_Det3_3: Q1_Det3.3 R3_Det3.1 R5_Det3.1
NetQ1_Det4_3: Q1_Det4.3 R3_Det4.1 R5_Det4.1
NetR4_Det1_1: R4_Det1.1 R5_Det1.2 | length 2.4
  Top Layer w1: R5_Det1.2@56.104,47.818 R4_Det1.1
NetR4_Det2_1: R4_Det2.1 R5_Det2.2 | length 2.4
  Top Layer w1: R5_Det2.2@104.139,47.87 R4_Det2.1@104.139,50.283
NetR4_Det3_1: R4_Det3.1 R5_Det3.2 | length 2.4
  Top Layer w1: R5_Det3.2 R4_Det3.1
NetR4_Det4_1: R4_Det4.1 R5_Det4.2 | length 2.4
  Top Layer w1: R5_Det4.2 R4_Det4.1
NetR7_2: R7.2 R9.2 Ready.2 | length 9.7
  Top Layer w0.5: R9.2@21.148,50.866 23.418,50.866 29.255,50.866 Ready.2
NetR9_1: R9.1 R10.2 | length 2.5
  Top Layer w0.5: R10.2 R9.1
NetR10_1: R10.1 R11.2 | length 2.5
  Top Layer w0.5: R11.2 R10.1
NetR12_2: R12.2 SW1.3 SW1.4 | length 17.2
  Top Layer w1: R12.2 51.353,40.877 SW1.4
  Bottom Layer w1: SW1.3 SW1.4
Power: Power.A1 SW-1.1

## Polygon pours and split planes (outlines as drawn)
NetD2_Cha1_2 on Top Layer "NETD2_CHA1_2_L01_P076" (solid, remove dead copper, pour order 76): 90.404,58.938 89.515,58.049 89.515,55.89 90.785,54.62 90.785,30.744 87.991,27.95 87.991,12.837 93.325,12.837 93.325,25.029 97.516,29.22 97.516,56.017 94.595,58.938
NetD2_Cha2_2 on Top Layer "NETD2_CHA2_2_L01_P102" (solid, remove dead copper, pour order 102): 137.511,57.597 137.586,57.597 138.983,58.994 142.539,58.994 145.512,55.946 145.512,29.276 141.321,25.085 141.321,12.893 135.987,12.893 135.987,28.006 138.781,30.8 138.781,54.676 137.511,55.946
+12 on Top Layer "+12_L01_P106" (solid, remove dead copper, pour order 106): 36.42,12.258 40.865,7.813 65.45,7.813 69.768,12.258 81.325,12.258 84.119,9.464 97.892,9.464 100.559,12.258 129.077,12.258 131.363,9.972 146.222,9.972 148.508,12.258 177.591,12.258 179.75,10.099 194.228,10.099 196.387,12.258 224.892,12.258 227.305,9.718 242.996,9.718 245.536,12.258 245.536,53.279 36.314,53.279 36.367,32.832 7.157,32.832 7.157,28.006 8.554,26.609 34.462,26.609 36.388,24.704
NetD6_2 on Top Layer "NETD6_2_L01_P105" (solid, remove dead copper, pour order 105): 49.448,59.502 50.591,58.359 50.591,54.93 49.448,53.787 49.448,28.641 46.996,26.189 46.996,11.541 41.662,11.541 41.662,30.927 45.13,34.36 45.13,55.311 45.13,58.697 45.934,59.502
NetD2_Cha3_2 on Top Layer "NETD2_CHA3_2_L01_P104" (solid, remove dead copper, pour order 104): 238.424,59.375 241.601,56.197 241.601,49.671 241.601,29.224 237.41,25.033 237.41,12.841 232.076,12.841 232.076,27.954 234.87,30.748 234.87,54.624 233.6,55.894 233.6,57.6 235.376,59.375
NetD2_Cha4_2 on Top Layer "NETD2_CHA4_2_L01_P103" (solid, remove dead copper, pour order 103): 190.418,59.248 193.564,56.102 193.564,49.671 193.564,29.224 189.373,25.033 189.373,12.841 184.039,12.841 184.039,27.954 186.833,30.748 186.833,54.624 185.563,55.894 185.563,57.568 187.243,59.248
NetQ1_Det3_3 on Top Layer "NETQ1_DET3_3_L01_P101" (solid, remove dead copper, pour order 101): 228.824,47.055 234.614,47.055 234.614,55.184 205.15,55.184 205.15,46.548 208.071,46.548 208.071,51.247 228.891,51.247
NetQ1_Det4_3 on Top Layer "NETQ1_DET4_3_L01_P096" (solid, remove dead copper, pour order 96): 180.691,47.055 186.481,47.055 186.481,55.184 157.017,55.184 157.017,46.548 159.938,46.548 159.938,51.247 180.758,51.247
NetQ1_Det2_3 on Top Layer "NETQ1_DET2_3_L01_P095" (solid, remove dead copper, pour order 95): 132.812,47.182 138.602,47.182 138.602,55.311 109.138,55.311 109.138,46.675 112.059,46.675 112.059,51.374 132.879,51.374
NetQ1_Det1_3 on Top Layer "NETQ1_DET1_3_L01_P080" (solid, remove dead copper, pour order 80): 84.933,47.055 90.723,47.055 90.723,55.184 61.259,55.184 61.259,46.548 64.18,46.548 64.18,51.247 85,51.247
+165 on Top Layer "+165_L01_P108" (solid, remove dead copper, pour order 108): 0.299,63.566 0.553,63.312 285.922,63.312 285.922,0.066 285.16,-0.696 -0.209,-0.696
Power on Top Layer "POWER_L01_P077" (solid, remove dead copper, pour order 77): 7.665,25.593 12.364,25.593 12.364,16.322 7.665,16.322
GND on Bottom Layer "GND_L02_P107" (solid, remove dead copper, pour order 107): -0.971,63.82 -0.59,63.439 287.827,63.439 287.827,-2.728 284.525,-6.03 281.731,-3.236 -0.717,-3.236
NetC2_1 on Bottom Layer "NETC2_1_L02_P100" (solid, remove dead copper, pour order 100): 14.396,45.532 14.396,58.232 13.253,59.375 8.363,59.375 8.363,54.549 10.332,54.549 10.332,28.26 12.364,26.228 12.364,12.766 8.935,9.337 8.935,3.335 13.888,3.335 17.858,7.305 17.952,7.305 17.952,21.623 34.716,21.623 34.716,27.592 24.081,27.592 16.809,34.864 16.809,40.071 23.794,40.071 25.445,41.722 25.445,45.532 22.016,45.532 21.762,45.278 21.762,42.865 14.396,42.865
NetC1_Cha3_1 on Bottom Layer "NETC1_CHA3_1_L02_P099" (solid, remove dead copper, pour order 99): 196.161,5.831 197.939,4.053 202.257,4.053 202.257,7.228 202.257,16.322 207.718,22.341 225.117,22.341 225.117,28.31 212.163,28.31 207.845,32.628 207.845,53.329 202.257,58.917 196.796,58.917 196.796,54.663 198.764,52.694 200.733,52.694 200.733,23.865 196.161,19.293
NetC1_Cha4_1 on Bottom Layer "NETC1_CHA4_1_L02_P098" (solid, remove dead copper, pour order 98): 148.123,5.831 149.901,4.053 154.219,4.053 154.219,7.228 154.219,16.88 159.68,22.341 177.079,22.341 177.079,28.31 164.125,28.31 159.807,32.628 159.807,53.329 154.219,58.917 148.758,58.917 148.758,54.662 150.726,52.694 152.695,52.694 152.695,23.865 148.123,19.293
NetC1_Cha2_1 on Bottom Layer "NETC1_CHA2_1_L02_P097" (solid, remove dead copper, pour order 97): 100.071,5.883 101.849,4.105 106.167,4.105 106.167,7.28 106.167,16.576 111.628,22.393 129.027,22.393 129.027,28.362 116.073,28.362 111.755,32.68 111.755,53.381 106.167,58.969 100.706,58.969 100.706,54.714 102.674,52.746 104.643,52.746 104.643,23.917 100.071,19.345
NetC1_Cha1_1 on Bottom Layer "NETC1_CHA1_1_L02_P079" (solid, remove dead copper, pour order 79): 52.242,5.654 54.02,3.876 58.338,3.876 58.338,7.051 58.338,16.322 63.799,22.164 81.198,22.164 81.198,28.133 68.244,28.133 63.926,32.451 63.926,53.152 58.338,58.74 52.877,58.74 52.877,54.486 54.845,52.517 56.814,52.517 56.814,23.688 52.242,19.116

## Silkscreen, mask and mechanical layers (free items; w line width, h text height)
Top Overlay:
  text "+165" at 1.823,48.072 h1
  text "Gnd" at 2.585,43.119 h1
  text "Gnd" at 2.458,34.991 h1
  text "+12" at 2.458,29.911 h1
  text "+12" at 2.712,18.1 h1
  text "Gnd" at 2.712,13.02 h1
Bottom Overlay:
  text "By: Yu Xiang Sun / Version 1.1" at 254.127,56.515 h1.52
Mechanical 1:
  the board outline again, w0.254
Mechanical 13:
  lines w0.254: -24.339,-115.885 ccw(c-23.069,-115.885) -23.069,-117.155